# Altium PCB stabilizer_current_sense.PcbDoc (part 3 of 3)
Units mm, origin at the board's own origin, x right, y up, seen from the top; angles counter-clockwise.
Board outline 113.55 x 100 mm, 4 copper layers (Top, L2, L3, Bottom Layer), stack 1.579 mm thick; 206 components, 77 nets, 530 pads, 258 vias.
Unrouted connection lines stored in the file: 53.
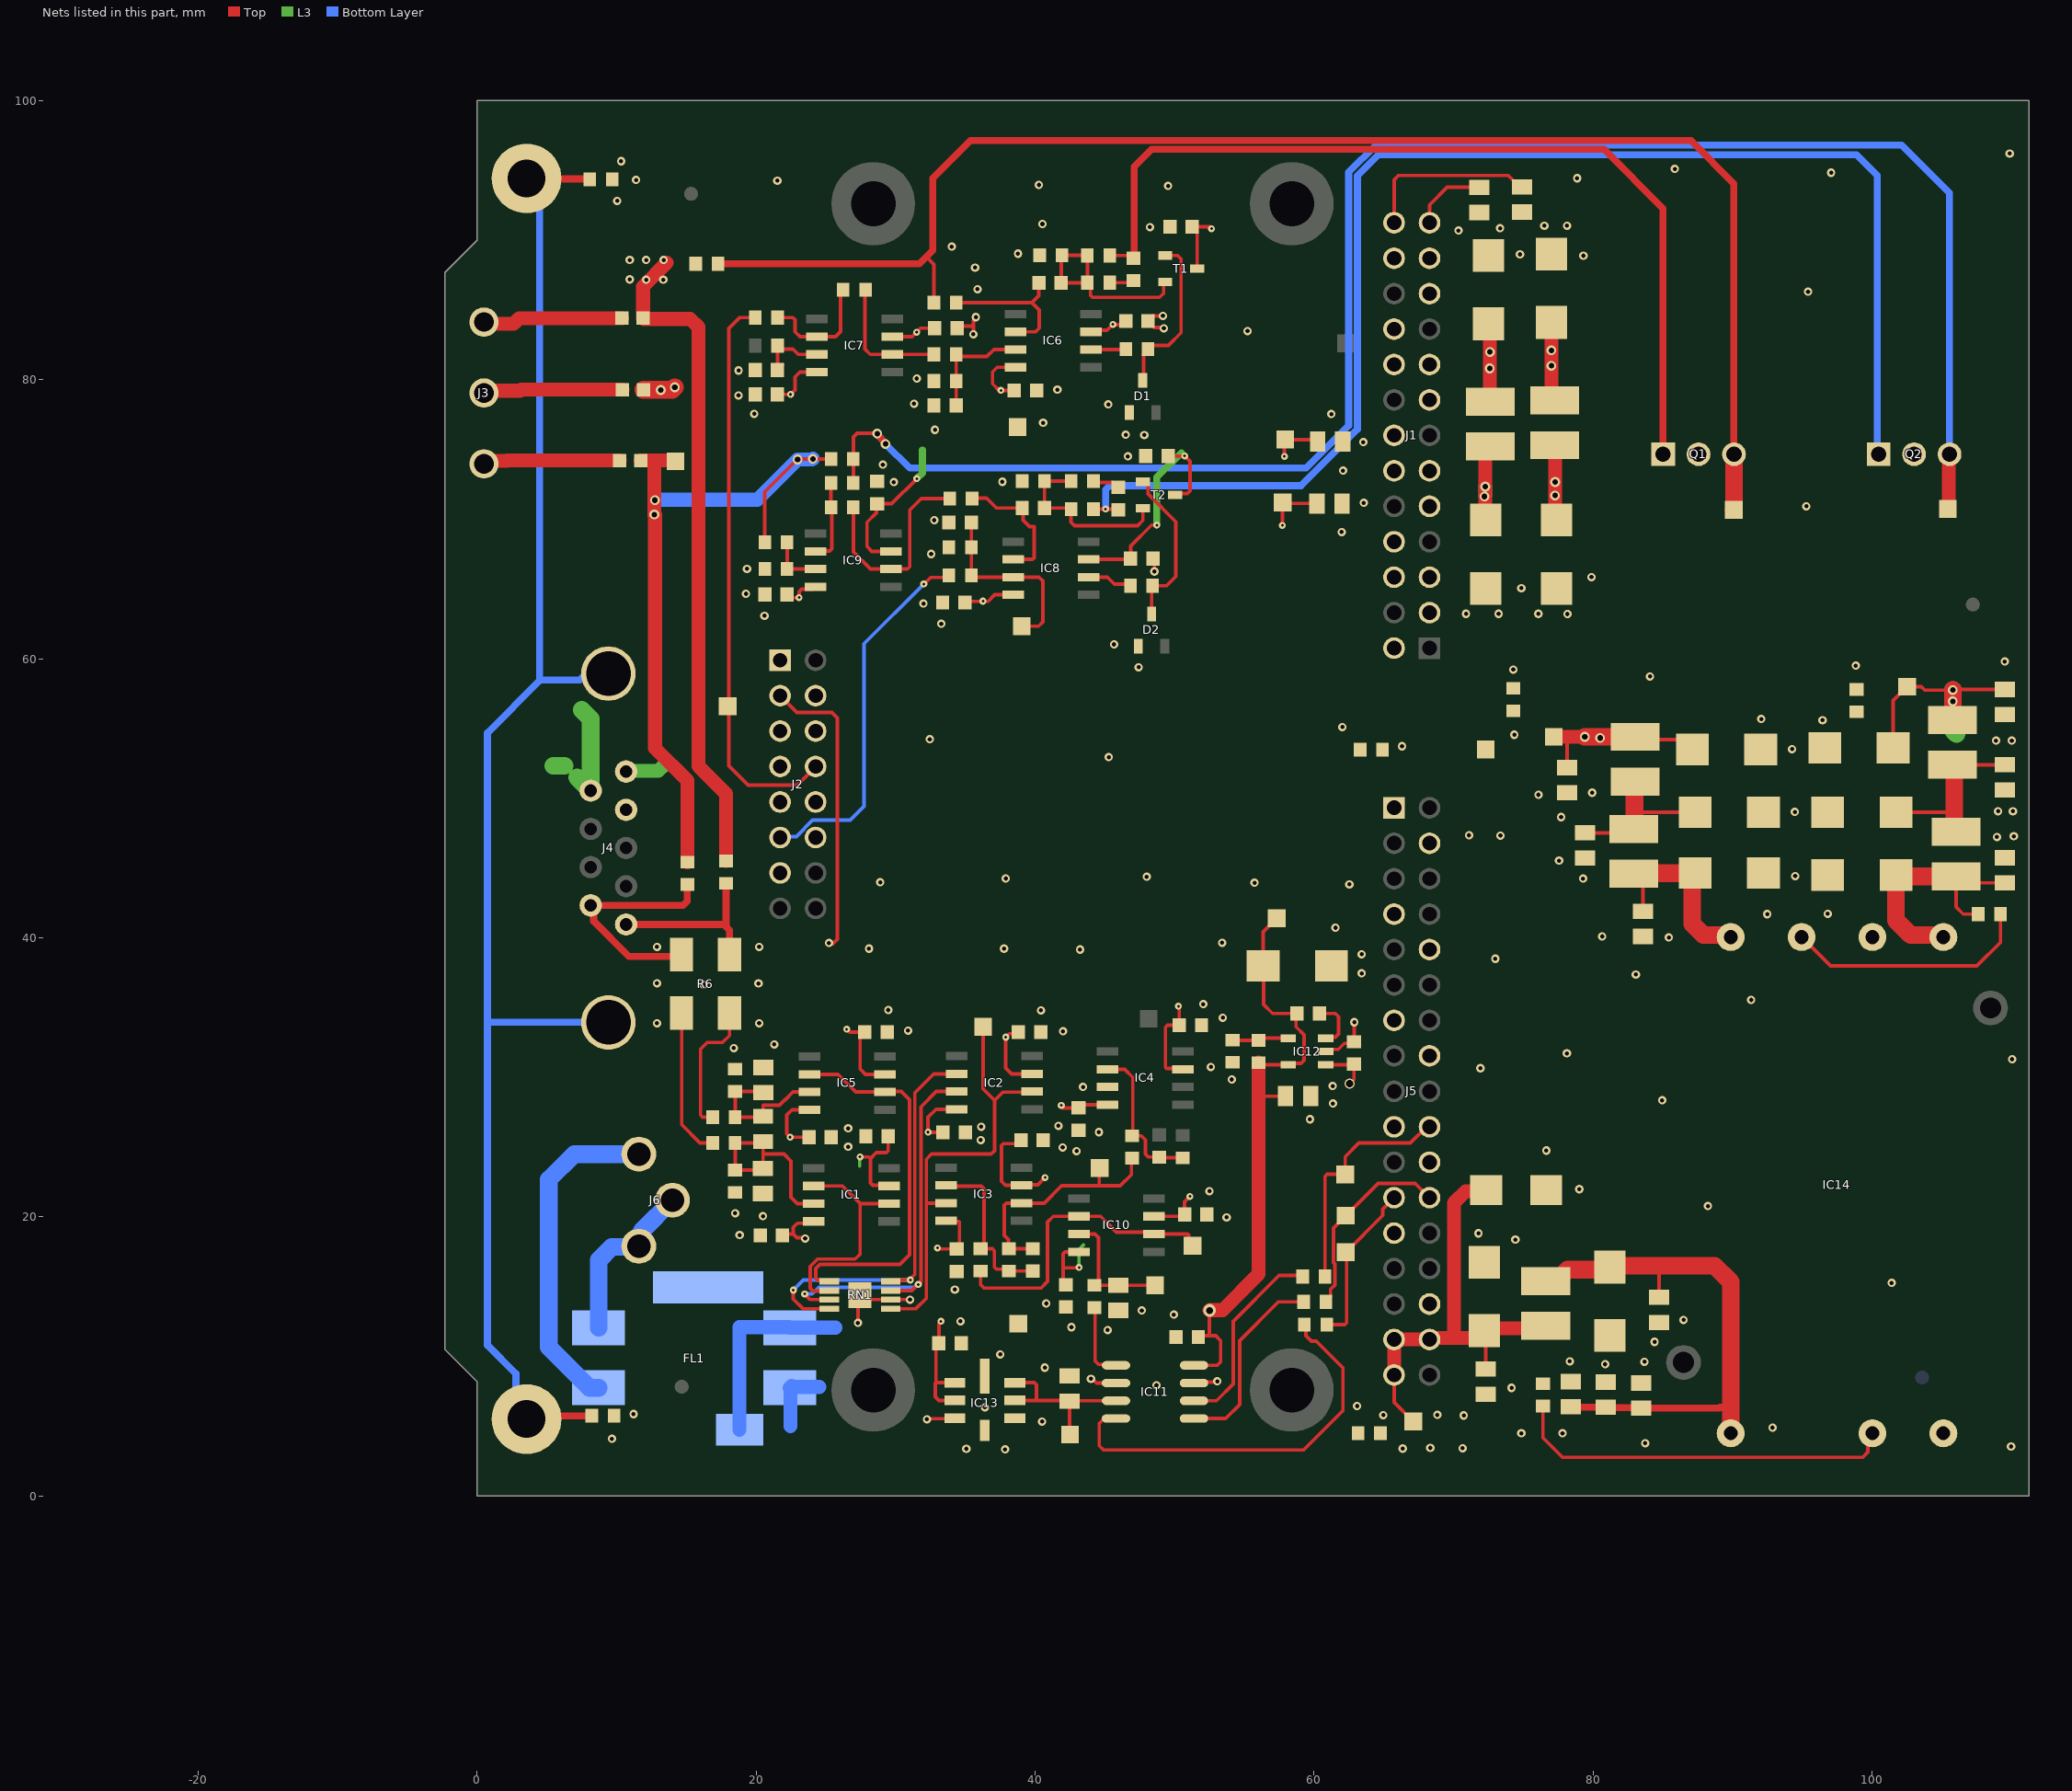
[diagram p4: the nets of this part, all layers, seen from the top]

## Via types
v1: diameter 0.6, hole 0.3, Top to Bottom Layer, tented both sides, 204 vias
v2: diameter 0.5, hole 0.2, Top to Bottom Layer, tented both sides, 32 vias
v3: diameter 0.7, hole 0.4, Top to Bottom Layer, tented both sides, 20 vias
v4: diameter 0.75, hole 0.5, Top to Bottom Layer, tented both sides, 1 vias
v5: diameter 0.9, hole 0.5, Top to Bottom Layer, tented both sides, 1 vias

## Nets (pads, with @x,y where several pads share a name; then routed paths per layer and width w, separated by ;. In a path a pad name is that pad's centre, name@x,y a point inside that pad or via, vN(x,y) a via of type N, cw(c..) or ccw(c..) an arc to the next point about the centre after c; other vN are vias at no path point) (continued)
COIL_COMMON: C3.1 C5.1 C6.1 C7.1 C8.1 C9.1 C10.1 C11.1 C12.1 C13.1 C14.1 C15.1 C16.1 C17.1 C19.1 C21.1 C23.1 C25.1 C26.1 C27.1 C28.1 C29.1 C30.1 C31.1 C32.1 C33.1 C34.2 C35.1 C36.1 C38.1 C39.2 C40.1 C41.2 C42.1 C43.2 C44.1 C45.1 C46.1 C47.1 C48.1 C49.1 C50.1 D1.1 D2.1 F1.1 IC4.3 IC11.2 IC11.7 IC12.2 IC13.3 IC13.4 IC13.5 IC13.8 J1.2 J1.3 J1.5 J1.6 J1.8 J1.9 J1.11 J1.12 J1.14 J1.15 J1.17 J1.18 J1.20 J1.21 J1.23 J1.24 J2.1 J2.3 J2.4 J2.5 J2.6 J2.7 J2.9 J2.10 J2.12 J2.13 R5.1 R9.1 R16.1 R18.1 R20.1 R25.1 R26.1 R32.1 R34.1 R40.1 R43.1 R44.1 R47.1 R48.1 R49.1 R50.1 RN1.6 RN1.9 TP13.1 TP14.1 | length 90.9
  Top w0.254: J2.3@21.73,57.35 22.93,56.15 25.425,56.15 25.825,55.75 25.825,39.905 v1@25.5,39.58 ; v1(27.3,12.406) 27.3,14.185 v1(27.506,14.391) 27.506,14.361 27.5,14.355 27.78,14.075 RN1.6@29.655,14.075 v1(31.036,14.075) ; C28.1@28.681,72.7 C28.1@28.95,72.969 ; v1(32.25,5.5) 32.292,5.542 34.208,5.542 IC13.3@34.25,5.583 ; C25.1@34.4,83.687 34.538,83.825 35.575,83.825 ; v1(35.575,83.25) 35.575,83.825 ; v1(35.75,84.475) 35.75,84.381 35.575,84.206 35.575,83.825 ; C9.1@40.584,25.502 C9.1@40.669,25.587 ; v1(42.001,33.302) v1@42.051,33.352 ; v1(44,8.4) 44.094,8.4 44.397,8.097 IC11.2@45.8,8.097 ; C27.1@48.43,67.195 C27.1@48.45,67.175 48.55,67.075 v1(48.55,66.25) ; v1(49.16,84.56) 48.448,84.56 48.1,84.212 C26.1@48.1,84.187 48.1,84.162 48.448,83.814 48.473,83.814 48.546,83.741 49.159,83.741 v1(49.225,83.675) ; IC11.7@51.388,8.097 51.452,8.161 52.991,8.161 v1(53.054,8.224) ; IC12.2@60.832,31.857 60.98,32.005 61.73,32.005 62.16,32.435 62.735,32.435 C42.1@62.85,32.55 62.875,32.575 v1(62.875,33.95)
  Top w1: 13.6,88.375 11.9,86.675 F1.1@11.9,84.4 11.958,84.342 15.289,84.342 15.875,83.757 15.875,52.302 17.85,50.327 R34.1@17.85,45.5
  other v1: 37.85,3.35 35.075,3.384 9.675,4.1 40.5,5.337 11.225,5.875 36.4,6.362 63.08,6.45 48.7,7.946 40.7,9.2 37.5,10.15 45.2,11.9 42.602,12.1 34.65,12.525 49.95,13.001 47.645,13.3 40.8,13.8 34.25,14.8 18.825,18.7 53.725,19.966 20.5,20.048 18.5,20.261 52.5,21.85 42.973,24.721 41.975,24.975 26.6,25.025 36.1,25.502 44.573,26.079 26.6,26.345 36.139,26.46 41.675,26.525 59.7,27 61.35,28.125 43.43,29.316 61.325,29.375 54.1,29.85 52.6,30.75 18.4,32.1 21.303,32.361 30.9,33.352 12.9,33.875 20.225,33.875 53.45,34.275 40.425,34.8 29.475,34.825 52.05,35.25 16.25,36.65 20.173,36.725 12.9,36.75 63.4,37.45 63.4,38.825 43.225,39.16 28.093,39.225 37.775,39.225 12.9,39.35 20.225,39.35 25.228,39.625 53.4,39.65 61.525,40.725 62.525,43.825 55.725,43.95 28.9,43.975 37.9,44.25 48,44.375 45.275,52.95 32.45,54.225 62.025,55.1 84.075,58.725 74.275,59.225 47.425,59.391 98.825,59.5 109.5,59.8 45.663,61.025 33.275,62.5 20.604,63.075 78.16,63.2 70.882,63.22 73.22,63.22 76.07,63.22 32,63.95 19.275,64.65 74.85,65.06 79.875,65.85 19.35,66.434 32.55,67.5 61.975,69.075 32.775,69.925 95.275,70.925 63.55,71.175 29.875,72.65 37.65,72.675 62.075,73.479 29.09,73.9 46.65,74.5 63.525,75.525 47.825,76.025 46.5,76.05 32.825,76.4 40.575,76.9 61.225,77.53 19.875,77.55 45.25,78.225 31.325,78.275 18.74,78.86 41.6,79.275 31.525,80.075 18.75,80.65 55.225,83.475 95.4,86.3 35.875,86.481 12.125,87.15 13.35,87.15 10.95,87.175 35.7,88.025 10.95,88.575 12.125,88.575 13.375,88.575 79.3,88.875 74.75,88.975 38.775,89.025 34.025,89.525 70.35,90.675 73.325,90.85 48.225,90.925 76.5,91.019 78.123,91.019 40.525,91.15 10.05,92.8 49.525,93.875 40.275,93.95 21.525,94.25 11.4,94.3 78.85,94.425 97.05,94.825 85.85,95.1 10.325,95.65 109.85,96.2
COIL_HIGH: F2.1 Q1.2 Q2.2 | length 2.3
  Top w1.27: F2.1@11.925,79.275 14,79.275 v3(14.175,79.45)
  other v3: 13.17,79.25
COIL_LOW: F3.1 R30.1 R31.2 R33.1 TP10.1 | length 55.3
  Top w0.254: R31.2@20.626,68.348 20.626,71.951 22.972,74.298 24.048,74.298 v3(24.07,74.32) ; v3@24.07,74.3 R30.1@25.376,74.3
  Top w1: F3.1@11.725,74.2 12.89,74.2 ; v3(12.71,70.33) 12.71,74.02 12.89,74.2 ; v3@12.76,70.33 12.76,53.579 15.075,51.264 R33.1@15.075,45.426 ; TP10.1@14.225,74.15 14.175,74.2 12.89,74.2
  Bottom Layer w1: v3(12.71,70.33) 12.71,71.34 12.76,71.39 20.09,71.39 v3(22.975,74.275) 24.025,74.275 v3(24.07,74.32)
  other v3: 12.75,71.36
DAC0_P: J2.8 R11.1 TP5.1 | length 40.9
  Top w0.254: R11.1@19.94,84.437 18.812,84.437 18.046,83.671 18.046,52.329 19.425,50.95 22.95,50.95 J2.8@24.27,52.27
DAC1_P: J2.11 R22.1 | length 26.7
  Top w0.254: v2(32.025,65.35) 32.025,65.325 32.525,65.825 33.68,65.825 R22.1@33.83,65.975
  Bottom Layer w0.254: J2.11@21.73,47.19 21.801,47.261 22.886,47.261 24.056,48.431 26.756,48.431 27.75,49.425 27.75,61.075 v2(32.025,65.35)
FP_GND: J4.10 J4.11 R43.2 R44.2 ST2.0 ST2.1 | length 113.5
  Top w0.5: ST2.0@2.788,6.28 ST2.0@3.556,5.512 ; ST2.1@3.556,94.412 3.587,94.381 8.055,94.381 R44.2@8.086,94.35 ; ST2.0@3.794,5.75 R43.2@8.225,5.75
  Top w1: ST2.0@3.556,5.512 ST2.0@3.794,5.75
  Bottom Layer w0.5: ST2.0@2.788,6.28 2.788,8.762 0.75,10.8 0.75,33.905 ; ST2.1@3.556,94.412 4.5,93.468 4.5,58.473 ; J4.11@7.823,58.93 7.366,58.473 4.5,58.473 ; J4.10@9.42,33.94 0.785,33.94 0.75,33.905 ; 0.75,33.905 0.75,54.675 4.5,58.425 4.5,58.473
FRONTEND_OFFSET: IC10.2 IC10.6 R1.1 TP11.1 | length 22.1
  Top w0.254: R1.1@36.094,16.122 36.094,15.14 36.334,14.9 40.42,14.9 40.891,15.371 40.891,19.634 41.299,20.042 IC10.2@43.134,20.042 44.699,20.042 45.834,18.907 48.399,18.907 IC10.6@48.534,18.772 50.928,18.772 51,18.7 51,17.937 TP11.1@51.1,17.837 ; TP11.1@51.281,17.947 TP11.1@51.287,17.941
GND1: C51.1 C52.2 C53.1 C54.2 C55.1 C56.2 C57.1 C58.2 C59.2 C60.1 C61.1 C62.1 C63.1 C64.1 C65.1 C66.1 C67.1 C68.1 C69.1 D3.2 FL1.4 IC14.3 IC14.5 J4.4 J5.1 J5.4 J5.7 J5.10 J5.13 J5.16 J5.19 J5.22 J5.25 J5.30 R41.1 R47.2 R48.2 R49.2 R50.2 TP15.1 | length 14.6
  L3 w1: J4.4@10.69,49.013 J4.4@10.69,49.175
  Bottom Layer w1: J4.4@10.69,49.175 J4.4@10.69,49.337 ; FL1.4@18.817,4.756 18.817,12.097 22.376,12.097 FL1.4@22.417,12.056 22.431,12.07 25.7,12.07
  other v1: 66.35,3.4 70.637,3.425 68.325,3.45 109.95,3.55 83.725,3.792 74.85,4.5 77.8,4.5 92.85,4.9 70.725,5.775 64.95,5.803 68.825,5.821 74.15,7.75 80.857,9.45 83.675,9.625 78.325,9.65 84.4,11.05 86.475,12.625 101.391,15.275 74.425,18.375 71.775,18.825 88.225,20.775 79,21.99 76.64,24.76 84.95,28.36 71.92,30.66 110.025,31.3 78.11,31.72 91.325,35.55 83.055,37.375 72.98,38.5 85.425,40.025 80.643,40.1 92.478,41.7 96.812,41.725 79.275,44.24 94.475,44.427 77.55,45.525 108.937,47.222 110.15,47.275 73.35,47.325 71.104,47.35 77.7,48.65 94.45,49.018 109.014,49.075 110.082,49.075 76.075,50.25 79.925,50.4 94.25,53.525 66.3,53.725 108.875,54.137 110,54.137 74.35,54.55 96.437,55.6 92.05,55.675
N12V0A: C11.2 C12.2 C13.2 C14.2 C15.2 C29.2 C30.2 C31.2 C32.2 C34.1 C49.2 C50.2 IC1.4 IC2.4 IC3.4 IC4.4 IC5.4 IC6.4 IC7.4 IC8.4 IC9.4 IC10.4 L2.2 TP22.1 | length 53
  Top w0.254: C29.2@21.54,78.937 v2(22.48,78.937) 22.8,79.257 22.8,80.187 23.145,80.532 IC7.4@24.35,80.532 ; C11.2@22.18,18.395 C11.2@21.9,18.675 22.002,18.777 22.675,18.777 ; C32.2@22.226,64.598 22.45,64.373 v2(23.082,64.373) 23.082,64.795 23.266,64.98 24.103,64.98 IC9.4@24.276,65.153 ; v1@23.508,18.45 v1(23.521,18.45) 23.455,18.516 22.935,18.516 22.675,18.777 ; C12.2@23.792,25.714 v2(22.438,25.714) 22.204,25.948 22.204,27.301 22.584,27.682 IC5.4@23.843,27.682 ; IC1.4@24.128,19.682 23.993,19.547 22.972,19.547 22.675,19.25 22.675,18.777 ; v2(33.004,17.774) 33.078,17.7 C14.2@34.379,17.7 C14.2@34.401,17.722 ; C13.2@33.251,26.199 C13.2@33.4,26.05 32.35,26.05 v2(32.325,26.075) 32.325,27.142 32.896,27.712 IC2.4@34.379,27.712 ; IC3.4@33.629,19.722 33.669,19.682 34.518,19.682 34.573,19.627 34.573,17.834 34.685,17.722 C14.2@34.401,17.722 ; C14.2@34.453,17.626 34.401,17.678 C14.2@34.401,17.722 ; C14.2@34.453,17.874 34.453,17.774 C14.2@34.401,17.722 ; C31.2@35.43,64.105 v2@36.275,64.105 ; v2(36.261,64.125) 36.261,64.119 v2@36.275,64.105 ; IC8.4@38.43,64.575 37.1,64.575 36.63,64.105 v2@36.275,64.105 ; C30.2@38.508,79.225 v2(37.55,79.225) 37.425,79.225 36.95,79.7 36.95,80.55 37.282,80.882 IC6.4@38.6,80.882 IC6.4@38.508,80.79 ; v2(41.875,28) 41.85,27.975 42.013,27.812 C15.2@43.113,27.812 43.347,28.046 IC4.4@45.191,28.046 ; C34.1@42.2,15.143 42,15.343 42,16.35 ; IC10.4@43.134,17.502 42.15,17.502 42,17.352 42,16.35 ; v2(43.15,16.375) 43.125,16.35 42,16.35 ; v2(57.725,69.55) 57.725,71.35 TP22.1@57.75,71.375 ; TP22.1@57.75,71.2 57.825,71.125 C49.2@60.2,71.125
  Top w1: C50.2@72.26,71.06 v3(72.26,72.33) 72.26,75.19 72.39,75.32 72.32,75.39 72.34,75.41 72.275,75.475 L2.2@72.4,75.6 ; C50.2@72.275,70.775 72.34,70.84 C50.2@72.32,70.86
  L3 w0.254: v2(43.15,16.375) 43.15,17.675 43.45,17.975
  L3 w1: v3@72.26,71.62 v3(72.26,72.33)
  other v3: 72.21,71.62
N12V0AS: C47.2 C48.2 J1.26 L2.1 | length 18.6
  Top w0.254: J1.26@65.73,91.24 65.73,94.32 66.035,94.625 73.9,94.625 74.725,93.8 C47.2@74.9,93.8 ; C48.2@72.5,84 C48.2@72.6,84.1
  Top w1: C48.2@72.6,84.1 72.639,84.061 72.6,84.022 v3(72.6,81.979) 72.6,78.452 L2.1@72.639,78.413
  other v3: 72.58,80.8
N15V0: C68.2 C69.2 J4.5 L7.2 TP25.1 | length 20.3
  Top w0.254: C69.2@101.5,53.6 101.5,57 TP25.1@102.5,58 103.516,58 103.766,57.75 v3(105.775,57.75) ; v3@105.825,57.8 C68.2@109.5,57.8
  Top w1.27: L7.2@105.75,55.6 105.775,55.625 v3(105.775,56.94) v3(105.775,57.75)
  L3 w1: J4.5@10.633,51.972 J4.5@10.69,51.915 10.74,51.965 12.99,51.965 13.425,52.4
  L3 w1.27: v3(105.775,57.75) 105.775,54.865 106.04,54.6
NetC1_1: C1.1 IC3.2 R1.2 R2.1 | length 11.5
  Top w0.254: IC3.2@34.384,22.197 36.139,22.197 36.334,22.002 36.334,18.045 36.091,17.802 R1.2@36.014,17.802 ; R1.2@36.094,17.722 36.935,17.722 37.084,17.573 37.084,16.401 37.233,16.252 37.994,16.252 R2.1@38.124,16.122 C1.1@39.834,16.122
NetC1_2: C1.2 IC3.6 R2.2 R7.1 TP3.1 | length 17.6
  Top w0.254: R2.2@38.004,17.722 R2.2@38.084,17.802 ; C1.2@39.834,17.722 R2.2@38.124,17.722 38.084,17.762 R2.2@38.084,17.802 ; TP3.1@44.637,23.5 44.6,23.463 44.6,22.239 ; R7.1@46.943,24.212 46.9,24.169 46.9,23.037 46.102,22.239 44.6,22.239 ; R2.2@38.084,17.802 38.084,18.388 37.8,18.672 37.8,20.843 37.949,20.992 IC3.6@39.029,20.992 40.651,20.992 41.898,22.239 44.6,22.239
NetC2_1: C2.1 IC4.2 R3.1 R7.2 | length 11.2
  Top w0.254: IC4.2@45.191,30.586 46.414,30.586 47,30 47,25.869 R7.2@46.943,25.812 47.6,25.812 47.9,25.512 47.9,24.5 48.1,24.3 C2.1@48.833,24.3 ; C2.1@48.9,24.279 48.879,24.3 C2.1@48.833,24.3 ; R3.1@50.581,24.241 48.892,24.241 C2.1@48.833,24.3
NetC3_2: C3.2 C4.2 IC1.3 R4.2 R5.2 | length 14.6
  Top w0.254: IC1.3@24.128,20.952 22.955,20.952 22.5,21.407 22.5,24.001 22,24.501 20.5,24.501 ; 20.5,24.501 C4.2@20.5,25.402 20.399,25.301 R4.2@18.5,25.301 R5.2@18.5,23.36 20.379,23.36 C3.2@20.5,23.481 20.5,24.501
NetC4_1: C4.1 C5.2 IC5.3 R8.2 R9.2 | length 10.5
  Top w0.254: C5.2@20.519,28.901 20.5,28.882 20.391,28.991 R9.2@18.5,28.991 R8.2@18.5,27.15 20.448,27.15 C4.1@20.5,27.202 20.5,28.001 21.679,28.001 22.079,28.401 22.1,28.401 22.651,28.952 IC5.3@23.843,28.952
NetC17_2: C17.2 IC6.3 R13.2 R16.2 | length 7.9
  Top w0.254: C17.2@34.35,78.142 R16.2@34.35,79.892 34.35,81.5 34.501,81.651 36.55,81.651 37.051,82.152 IC6.3@38.6,82.152
NetC18_1: C18.1 R17.2 | length 2.3
  Top w0.254: R17.2@45.35,86.948 46.905,86.948 C18.1@47.05,87.092 C18.1@46.702,87.44
NetC18_2: C18.2 Q1.1 R14.2 | length 66
  Top w0.254: R14.2@45.495,89.037 R14.2@45.35,88.892 C18.2@46.85,88.892
  Top w0.5: C18.2@46.85,88.892 47.075,88.892 47.1,88.917 47.1,95.25 48.346,96.496 80.773,96.496 85.01,92.259 Q1.1@85.01,74.775
NetC19_2: C19.2 IC7.3 R15.2 | length 5.3
  Top w0.254: C19.2@21.54,80.687 C19.2@21.54,80.712 ; C19.2@21.913,81.06 21.888,81.06 C19.2@21.54,80.712 ; IC7.3@24.35,81.802 23.036,81.802 22.651,82.187 21.79,82.187 R15.2@21.54,82.437 C19.2@21.54,80.712
NetC20_1: C20.1 IC6.2 R19.1 | length 11.4
  Top w0.254: R19.1@34.673,85.835 R19.1@34.35,85.512 39.768,85.512 ; IC6.2@38.6,83.422 40.035,83.422 40.3,83.687 40.3,84.98 39.768,85.512 ; C20.1@40.27,86.925 40.27,86.015 39.768,85.512
NetC20_2: C20.2 R14.1 R17.1 R18.2 T1.2 | length 14.9
  Top w0.254: T1.2@49.315,86.992 49.215,86.892 49.215,86.192 48.915,85.892 44.121,85.892 43.972,86.041 43.972,86.725 R17.1@43.75,86.948 ; R17.1@43.75,86.948 43.727,86.925 C20.2@41.87,86.925 41.87,88.845 R18.2@41.925,88.9 43.742,88.9 R14.1@43.75,88.892 R17.1@43.75,86.948
NetC22_1: C22.1 R24.2 | length 2
  Top w0.254: R24.2@44.18,72.725 44.282,72.623 45.613,72.623 C22.1@45.961,72.275
NetC22_2: C22.2 Q2.1 R23.2 | length 99.9
  Top w0.254: R23.2@44.18,70.725 v2(45.05,70.725) 45.911,70.725 C22.2@45.961,70.675
  Bottom Layer w0.5: v2(45.05,70.725) 45.05,72.105 45.343,72.398 59.06,72.398 63.1,76.438 63.1,94.588 64.612,96.1 98.875,96.1 100.35,94.625 100.35,75.31 Q2.1@101.01,74.65
NetC23_2: C23.2 IC8.3 R22.2 R25.2 TP8.1 | length 13.6
  Top w0.254: C23.2@35.43,69.765 R25.2@35.43,67.975 R22.2@35.43,65.975 35.56,65.845 IC8.3@38.43,65.845 40.28,65.845 40.55,65.575 40.55,62.63 40.245,62.325 TP8.1@39.05,62.325
NetC24_1: C24.1 IC8.2 R28.1 | length 9.6
  Top w0.254: R28.1@35.48,71.475 35.505,71.5 36.525,71.5 37.225,70.8 C24.1@39.075,70.8 39.15,70.725 39.15,69.925 39.6,69.475 39.93,69.475 39.93,67.225 39.82,67.115 IC8.2@38.43,67.115
NetC24_2: C24.2 R23.1 R24.1 R26.2 T2.2 | length 13
  Top w0.254: R24.1@42.58,72.725 R26.2@40.68,72.725 40.675,72.72 C24.2@40.675,70.8 42.505,70.8 R23.1@42.58,70.725 42.58,69.774 42.829,69.525 47.345,69.525 47.73,69.91 T2.2@47.73,70.775
NetC37_1: C37.1 IC12.3 | length 4
  Top w0.254: C37.1@60.551,34.751 C37.1@60.375,34.575 61.525,34.575 61.75,34.35 61.75,33.1 61.525,32.875 60.9,32.875 IC12.3@60.832,32.807
NetC51_2: C51.2 C52.1 IC14.7 L3.1 | length 14.2
  Top w0.254: L3.1@82.9,44.6 83.573,43.927 C51.2@83.573,41.9
  Top w1.27: L3.1@82.9,44.6 82.925,44.625 C52.1@87.275,44.625 ; C52.1@87.3,44.65 C52.1@87.275,44.625 ; IC14.7@89.855,40.055 89.715,40.195 87.905,40.195 87.1,41 87.1,44.45 C52.1@87.275,44.625
NetC53_2: C53.2 C54.1 L3.2 L4.1 | length 11.6
  Top w0.254: C53.2@79.4,47.522 82.622,47.522 L3.2@82.9,47.8 ; 82.95,49.4 83.35,49 C54.1@87.3,49
  Top w1.27: L3.2@82.9,47.8 82.95,47.85 82.95,49.4 82.95,51.15 L4.1@83,51.2
NetC59_1: C59.1 C60.2 C61.2 C62.2 C63.2 IC14.1 L5.2 | length 38.4
  Top w0.254: C60.2@84.72,14.242 84.72,16.22 85,16.5
  Top w0.5: C63.2@78.4,6.4 78.419,6.381 80.881,6.381 C61.2@80.9,6.362 80.931,6.331 83.411,6.331 C62.2@83.442,6.3 89.037,6.3 89.087,6.349 89.855,6.349
  Top w1: IC14.1@89.7,4.313 IC14.1@89.852,4.161 ; IC14.1@89.853,4.498 IC14.1@89.855,4.495
  Top w1.27: L5.2@77.35,15.4 78.17,16.22 81.02,16.22 C59.1@81.2,16.4 81.3,16.5 85,16.5 88.7,16.5 89.855,15.345 89.855,6.349 IC14.1@89.855,4.495
NetC64_2: C64.2 C65.2 IC14.4 L6.1 R42.1 | length 19.2
  Top w0.254: C65.2@101.7,44.4 C65.2@101.8,44.4 ; L6.1@105.4,44.4 L6.1@106,44.4 ; R42.1@107.594,41.7 106.52,41.7 106,42.22 L6.1@106,44.4 ; C64.2@109.5,43.935 106.465,43.935 L6.1@106,44.4
  Top w1.27: C65.2@101.7,44.4 101.7,41.249 102.755,40.195 104.955,40.195 IC14.4@105.095,40.055 ; C65.2@101.7,44.5 101.8,44.4 L6.1@105.4,44.4
NetC66_2: C66.2 C67.2 L6.2 L7.1 | length 12.9
  Top w0.254: C67.2@101.7,49 105.625,49 105.875,49.25 ; L7.1@105.75,52.4 C66.2@109.5,52.4
  Top w1.27: L7.1@105.75,52.4 105.875,52.275 105.875,49.25 105.875,47.725 L6.2@106,47.6
NetD1_3: D1.3 R12.2 T1.1 | length 11.8
  Top w0.254: D1.3@47.715,79.942 47.777,80.004 47.777,81.864 R12.2@48.1,82.187 48.35,82.437 49.55,82.437 50.465,83.352 50.465,88.652 50.225,88.892 T1.1@49.315,88.892
NetD2_3: D2.3 R21.2 T2.1 | length 11.9
  Top w0.254: T2.1@47.73,72.675 47.93,72.675 48.103,72.502 48.103,71.802 50.095,69.81 50.095,65.89 49.43,65.225 R21.2@48.43,65.225 48.35,65.145 D2.3@48.35,63.2
NetF1_2: F1.2 J3.1 | length 10.1
  Top w1: J3.1@0.5,84.125 0.625,84 2.625,84 3.025,84.4 F1.2@10.4,84.4
NetF2_2: F2.2 J3.2 | length 10
  Top w1: J3.2@0.5,79.045 0.655,79.2 3.075,79.2 3.15,79.275 F2.2@10.425,79.275
NetF3_2: F3.2 J3.3 | length 9.8
  Top w1: J3.3@0.5,73.965 0.71,74.175 2.15,74.175 2.175,74.2 F3.2@10.225,74.2
NetFL1_1: FL1.1 J6.3 | length 24
  Bottom Layer w1.27: FL1.1@8.717,7.756 8.067,7.756 5.15,10.673 5.15,22.68 6.97,24.5 J6.3@11.6,24.5
NetFL1_3: FL1.3 J6.1 J6.2 | length 12.4
  Bottom Layer w1.27: FL1.3@8.717,12.056 8.717,16.905 9.66,17.848 11.548,17.848 J6.2@11.6,17.9 11.78,18.08 11.78,18.969 J6.1@14.011,21.2
NetIC1_2: IC1.2 IC1.6 RN1.2 | length 16.7
  Top w0.254: IC1.2@24.128,22.222 26.193,22.222 27.463,20.952 ; RN1.2@25.255,14.725 25.228,14.698 24.069,14.698 23.887,14.88 23.887,16.456 24.412,16.981 27.1,16.981 27.463,17.344 27.463,20.952 ; IC1.6@29.64,21.064 IC1.6@29.528,20.952 27.463,20.952
NetIC2_2: IC2.2 RN1.4 RN1.8 | length 30.4
  Top w0.254: v2(22.67,14.753) 22.67,14.11 23.355,13.425 RN1.4@25.255,13.425 ; RN1.8@29.655,15.375 29.76,15.48 v2(31.06,15.48) 31.06,15.56 31.381,15.881 31.381,28.898 32.735,30.252 IC2.2@34.041,30.252
  Bottom Layer w0.254: v2(22.67,14.753) 23.397,15.48 v2(31.06,15.48)
NetIC2_3: IC2.3 RN1.3 RN1.7 | length 28.3
  Top w0.254: v2(23.49,14.48) 23.895,14.075 RN1.3@25.255,14.075 ; RN1.7@29.425,14.725 RN1.7@29.434,14.716 ; RN1.7@29.655,14.725 31.173,14.725 31.608,15.16 v2(31.63,15.16) 31.821,15.351 31.821,27.886 32.917,28.982 IC2.3@34.379,28.982
  Bottom Layer w0.254: v2(23.49,14.48) 24.026,14.48 24.491,14.945 31.349,14.945 31.563,15.16 v2(31.63,15.16)
NetIC5_2: IC5.2 IC5.6 RN1.1 | length 28.1
  Top w0.254: IC5.2@23.843,30.222 25.873,30.222 27.143,28.952 IC5.6@29.243,28.952 29.282,28.991 30.399,28.991 31,28.39 31,17.302 30.298,16.6 24.57,16.6 24.27,16.3 24.27,15.834 24.268,15.832 24.268,15.622 24.417,15.473 25.157,15.473 RN1.1@25.255,15.375 ; RN1.1@25.702,15.473 RN1.1@25.8,15.375
NetIC6_6: IC6.6 R12.1 | length 2.5
  Top w0.254: IC6.6@44,82.152 46.465,82.152 R12.1@46.5,82.187
NetIC7_2: IC7.2 R10.1 R11.2 | length 9
  Top w0.254: R11.2@21.655,84.322 R11.2@21.54,84.437 22.651,84.437 22.8,84.289 22.8,83.422 23.15,83.072 IC7.2@24.35,83.072 25.685,83.072 26.05,83.437 26.05,86.237 R10.1@26.25,86.437
NetIC7_6: IC7.6 R10.2 R13.1 | length 9.4
  Top w0.254: R10.2@27.85,86.437 27.8,86.387 27.8,82.187 28.185,81.802 IC7.6@29.75,81.802 R13.1@32.75,81.802
NetIC8_6: IC8.6 R21.1 | length 3.3
  Top w0.254: IC8.6@43.83,65.845 45.19,65.845 45.68,65.355 46.7,65.355 R21.1@46.83,65.225
NetIC9_2: IC9.2 R27.2 R29.1 | length 6
  Top w0.254: IC9.2@24.276,67.693 24.302,67.719 25.277,67.719 25.432,67.873 25.432,70.792 R27.2@25.376,70.848 R29.1@25.376,72.598
NetIC9_3: IC9.3 R31.1 R32.2 | length 4
  Top w0.254: R31.1@22.226,68.348 R32.2@22.226,66.423 IC9.3@24.276,66.423
NetIC9_6: IC9.6 R27.1 R28.2 | length 15.4
  Top w0.254: R27.1@27.226,70.598 R27.1@26.976,70.848 26.975,67.65 28.202,66.423 IC9.6@29.676,66.423 30.857,66.423 31.015,66.58 31.015,70.645 31.845,71.475 R28.2@33.88,71.475
NetIC11_1: IC11.1 R35.1 | length 5.5
  Top w0.254: R35.1@44.243,13.498 44.3,13.441 44.3,9.69 44.555,9.435 45.732,9.435 IC11.1@45.8,9.367
NetIC11_4: IC11.4 R38.1 | length 29.9
  Top w0.254: IC11.4@46.505,5.557 IC11.4@45.8,5.557 44.955,5.557 44.6,5.202 44.6,3.6 44.9,3.3 59.251,3.3 62.063,6.112 62.063,9.187 60.15,11.1 59.8,11.1 59.4,11.5 59.4,12.175 R38.1@59.3,12.275
NetIC11_5: IC11.5 R37.2 | length 14.1
  Top w0.127: R37.2@59.403,14.054 R37.2@59.442,14.015
  Top w0.254: IC11.5@51.388,5.557 53.657,5.557 54.661,6.561 54.661,11.136 57.44,13.915 R37.2@59.25,13.915
NetIC11_6: IC11.6 R36.2 | length 14.4
  Top w0.254: IC11.6@51.388,6.827 52.997,6.827 54.2,8.03 54.2,12.521 57.479,15.8 R36.2@59.375,15.8 ; R36.2@59.317,15.875 R36.2@59.367,15.825
NetIC12_4: IC12.4 R39.1 R40.2 | length 4
  Top w0.254: R40.2@54.15,32.675 54.175,32.65 R39.1@56.025,32.65 ; R39.1@56.025,32.807 IC12.4@58.132,32.807
NetIC14_2: IC14.2 R41.2 | length 27.8
  Top w0.254: R41.2@76.4,6.45 76.4,4.175 77.8,2.775 99.315,2.775 99.689,3.149 99.689,4.169 IC14.2@100.015,4.495
NetIC14_6: IC14.6 R42.2 | length 17.8
  Top w0.254: IC14.6@94.935,40.055 97.01,37.98 107.5,37.98 109.194,39.674 R42.2@109.194,41.7
NetQ1_3: Q1.3 R19.2 R20.2 TP7.1 | length 107.8
  Top w0.254: 32.211,88.792 32.75,88.252 R19.2@32.75,85.512 R19.2@32.675,85.587
  Top w0.5: R20.2@17.275,88.3 31.719,88.3 32.211,88.792 32.675,89.256 32.675,94.425 35.373,97.123 87.002,97.123 90.09,94.035 Q1.3@90.09,74.775
  Top w1.27: TP7.1@90.075,70.675 90.09,70.69 Q1.3@90.09,74.775
NetQ2_3: Q2.3 R29.2 R30.2 TP9.1 | length 128.7
  Top w0.254: R29.2@26.976,72.598 R30.2@26.976,74.3 26.976,75.884 27.246,76.155 28.665,76.155 v3(28.69,76.13)
  Top w0.5: v3(28.69,76.13) 28.728,76.092 28.728,75.996 29.28,75.444 v3(29.28,75.39)
  Top w1: Q2.3@105.4,74.51 105.483,74.428 105.483,70.783 TP9.1@105.425,70.725
  Top w1.27: Q2.3@105.4,74.51 Q2.3@105.54,74.65
  Bottom Layer w0.5: v3(28.69,76.13) 28.728,76.092 28.728,75.996 29.28,75.444 v3(29.28,75.39) ; v3@29.281,75.391 31.021,73.652 59.427,73.652 62.473,76.698 62.473,94.848 64.425,96.8 102.105,96.8 105.54,93.365 105.54,75.2 Q2.3@106.09,74.65
NetR4_1: R4.1 R6.E2 | length 10.9
  Top w0.254: R6.E2@14.67,34.6 14.67,26.609 15.978,25.301 R4.1@16.9,25.301 ; R6.E2@15.1,34.73 R6.E2@15.17,34.8
NetR6_E1: R6.E1 R8.1 | length 9.7
  Top w0.254: R8.1@16.9,27.15 16.174,27.15 16.025,27.299 16.025,32.025 16.5,32.5 17.6,32.5 18.1,33 R6.E1@18.1,34.6
P5V0: C36.2 C37.2 C43.1 C44.2 C45.2 IC11.8 IC12.5 IC13.1 IC13.2 R39.2 TP20.1 | length 54.9
  Top w0.254: v2(33.25,12.525) 33.105,12.38 C45.2@33.105,10.95 32.9,10.745 32.9,8.123 ; IC13.2@34.25,6.853 33.105,6.853 32.855,7.103 32.855,8.078 32.9,8.123 ; IC13.1@34.25,8.123 32.9,8.123 ; IC11.8@51.388,9.367 53.054,9.367 53.3,9.613 53.3,11.141 52.941,11.5 52.5,11.5 ; C36.2@51.7,11.4 51.8,11.5 52.5,11.5 ; v5(52.5,13.3) 52.5,11.5 ; 56.025,28.75 56.125,28.65 C44.2@57.95,28.65 C44.2@58.175,28.425 ; R39.2@56.025,30.907 IC12.5@58.132,30.907 58.239,31.013 59.063,31.013 59.275,31.225 59.275,33.05 58.7,33.625 58.7,34.5 C37.2@58.775,34.575 57.025,34.575 56.375,35.225 56.375,37.975 C43.1@56.35,38 56.35,40.427 TP20.1@57.325,41.402 TP20.1@57.833,40.894
  Top w0.508: C43.1@55.813,38.613 C43.1@55.9,38.7 ; R39.2@56.025,30.854 56.071,30.9 R39.2@56.175,30.9
  Top w1: v5(52.5,13.3) 52.525,13.325 53.45,13.325 56.025,15.9 56.025,28.75 56.025,30.854 56.025,30.907 R39.2@56.025,31.05
P12V0A: C6.2 C7.2 C8.2 C9.2 C10.2 C16.2 C21.2 C25.2 C26.2 C27.2 C28.2 C35.2 C40.2 C41.1 C42.2 IC1.7 IC2.7 IC3.7 IC4.7 IC5.7 IC6.7 IC7.7 IC8.7 IC9.7 IC10.7 IC12.1 L1.2 T1.3 T2.3 TP19.1 | length 87.4
  Top w0.254: v2(26.5,33.45) 26.704,33.246 C7.2@27.8,33.246 27.463,32.909 27.463,30.587 27.828,30.222 IC5.7@29.243,30.222 ; v2(27.455,24.3) 28.087,24.3 28.2,24.187 ; C6.2@29.469,25.779 29.469,24.749 29.321,24.6 28.613,24.6 28.2,24.187 ; IC1.7@29.528,22.222 29.485,22.265 28.372,22.265 28.2,22.437 28.2,24.187 ; IC9.7@29.676,67.693 28.296,67.693 27.954,68.035 27.954,69.773 28.625,70.444 28.625,71.044 C28.2@28.681,71.1 29.725,71.1 v2(31.525,72.9) ; IC7.7@29.75,83.072 31.185,83.072 v2(31.513,83.4) 31.8,83.687 C25.2@32.8,83.687 ; C8.2@38.8,33.246 38.685,33.131 38.152,33.131 v2(37.9,32.88) 37.9,30.667 38.315,30.252 IC2.7@39.779,30.252 ; C9.2@38.984,25.502 38.734,25.252 37.733,25.252 37.584,25.103 37.584,22.551 37.873,22.262 IC3.7@39.029,22.262 39.066,22.299 40.185,22.299 v2(40.711,22.825) ; IC8.7@43.83,67.115 C27.2@46.83,67.115 ; IC6.7@44,83.422 44.121,83.543 45.156,83.543 45.55,83.937 v2@45.562,83.937 ; v2(45.575,83.95) v2@45.562,83.937 ; C26.2@46.5,84.187 46.25,83.937 v2@45.562,83.937 ; C27.2@46.85,67.175 46.85,68.075 48.35,69.575 v2(48.725,69.575) ; IC10.7@48.534,20.042 50.579,20.042 C35.2@50.714,20.177 50.714,21.089 v2(51.1,21.475) ; C21.2@49.53,74.525 v2(50.725,74.525) 51.1,74.15 51.1,72.025 50.911,71.836 50.141,71.836 T2.3@50.03,71.725 ; v2(50.275,35.101) 50.331,35.045 C10.2@50.331,33.735 49.495,33.735 49.346,33.586 49.346,30.718 49.435,30.629 50.548,30.629 IC4.7@50.591,30.586 ; T1.3@51.615,87.942 51.613,87.944 51.613,90.594 C16.2@51.265,90.942 52.523,90.942 v2(52.65,90.815) ; v2(57.869,74.5) 57.869,75.644 TP19.1@57.925,75.7 60.1,75.7 C40.2@60.25,75.55 ; IC12.1@60.832,30.907 62.807,30.907 C42.2@62.85,30.95 62.85,29.859 v4(62.541,29.55)
  Top w1: L1.2@77.23,75.3 77.27,75.26 77.27,70.78 C41.1@77.325,70.725
  L3 w0.254: 27.425,23.65 27.425,24.27 v2(27.455,24.3)
  L3 w0.5: v2(31.525,72.9) 31.925,73.3 31.925,74.95 ; v2(48.725,69.575) 48.725,73 50.488,74.763
  other v3: 77.26,71.7 77.27,72.66
P12V0AS: C38.2 C39.1 J1.25 L1.1 | length 11.2
  Top w0.254: J1.25@68.27,91.24 68.27,92.514 69.531,93.775 71.65,93.775 C38.2@71.227,94.198
  Top w1: C39.1@77,84.1 v3(77,82.09) 77,79.1 L1.1@77.3,78.8
  other v3: 77,80.99
P12V0S: C57.2 C58.1 D3.1 FL1.2 J5.31 J5.32 J5.33 L5.1 TP24.1 | length 38.5
  Top w0.254: J5.33@65.73,8.68 65.73,6.716 TP24.1@67.1,5.346 ; J5.31@65.73,10.9 J5.31@65.73,11.22 ; C58.1@72.2,11.858 72.3,11.758 C57.2@72.3,9.1 ; C57.2@72.325,9.12 C57.2@72.352,9.093
  Top w1: J5.33@65.73,8.68 J5.31@65.73,10.9 ; J5.31@65.73,11.22 J5.32@68.27,11.22 68.375,11.325 70.025,11.325 ; D3.1@72.33,21.93 72.24,21.84 70.86,21.84 70.025,21.005 70.025,11.325 ; L5.1@77.1,12.2 L5.1@76.6,12.2 76.325,12.2 76.1,11.975 76.046,12.029 72.371,12.029 C58.1@72.2,11.858 71.667,11.325 70.025,11.325
  L3 w1.27: J5.32@68.27,11.22 J5.32@68.27,11.296
  Bottom Layer w1: FL1.2@22.417,7.756 FL1.2@22.47,7.703 ; 22.47,5.006 FL1.2@22.47,7.703 ; 24.52,7.82 22.607,7.82 22.544,7.883 22.47,7.809 FL1.2@22.47,7.703
P15V0: C55.2 C56.1 J4.9 L4.2 TP23.1 | length 21
  Top w0.254: C55.2@78.123,52.2 78.123,54.223 78.3,54.4 ; L4.2@83,54.4 83.2,54.2 86.4,54.2 C56.1@87.1,53.5
  Top w1: TP23.1@77.045,54.4 TP23.1@77.171,54.4 78.3,54.4 v3(79.4,54.4)
  Top w1.27: J4.9@8.061,50.545 J4.9@8.15,50.545 ; v3(79.4,54.4) L4.2@83,54.4
  L3 w1.27: 5.475,52.325 6.281,52.325 ; 7.175,51.5 8.13,50.545 J4.9@8.15,50.545 8.15,55.688 7.5,56.338
  other v3: 80.49,54.32
REF_2V5: C46.2 IC11.3 IC13.6 IC13.7 TP21.1 | length 12.4
  Top w0.254: IC13.6@38.55,6.853 40.1,6.853 ; IC13.7@38.55,8.123 39.951,8.123 40.1,7.974 40.1,6.853 ; TP21.1@42.5,4.4 42.475,4.425 C46.2@42.475,6.8 ; IC11.3@45.8,6.827 42.502,6.827 C46.2@42.475,6.8 ; 40.1,6.853 42.422,6.853 C46.2@42.475,6.8
SPI_CLK: J5.24 R37.1 TP16.1 | length 14.2
  Top w0.254: R37.1@60.85,13.915 61.173,14.238 61.173,14.814 61.479,15.12 61.479,16.626 61.379,16.726 61.379,19.211 TP16.1@62.268,20.1 64.577,22.409 67.241,22.409 J5.24@68.27,21.38
SPI_CS: J5.23 R38.2 TP18.1 | length 11.9
  Top w0.254: R38.2@60.9,12.275 62.176,12.275 62.325,12.424 62.325,17.409 TP18.1@62.268,17.466 64.913,20.111 64.913,20.563 J5.23@65.73,21.38
SPI_MOSI: J5.20 R36.1 TP17.1 | length 16.9
  Top w0.254: R36.1@60.775,15.725 60.775,22.901 60.924,23.05 TP17.1@62.225,23.05 62.225,24.319 63.2,25.294 66.894,25.294 68.06,26.46 J5.20@68.27,26.46
transformer_Iret: J4.1 R6.I1 R34.2 | length 12.8
  Top w0.508: J4.1@10.69,40.955 17.695,40.955 17.85,40.8 ; R6.I1@17.85,39.04 R6.I1@18.1,38.79 18.1,40.55 17.85,40.8 ; R34.2@17.85,43.9 17.85,40.8
transformer_Isource: J4.6 R6.I2 R33.2 | length 17.5
  Top w0.508: R6.I2@15.075,39.195 R6.I2@14.67,38.79 14.549,38.669 10.881,38.669 8.359,41.191 8.359,42.116 J4.6@8.15,42.325 14.777,42.325 15.075,42.623 R33.2@15.075,43.826
v_DAC: C33.2 IC10.3 R35.2 TP12.1 | length 9.4
  Top w0.254: IC10.3@43.134,18.772 44.29,18.772 44.558,18.505 44.558,15.413 R35.2@44.243,15.098 45.962,15.098 C33.2@45.964,15.1 48.598,15.1 TP12.1@48.6,15.098
V_DIFF: IC2.6 IC3.3 RN1.5 TP2.1 | length 31
  Top w0.254: RN1.5@30.2,13.425 31.471,13.425 32.205,14.159 32.205,20.952 ; IC3.3@33.629,20.992 32.245,20.992 32.205,20.952 ; TP2.1@36.276,33.625 36.276,29.171 37.1,28.347 ; IC2.6@39.784,28.947 37.7,28.947 37.1,28.347 ; 32.205,20.952 32.205,24.135 32.571,24.501 36.853,24.501 37.1,24.748 37.1,28.347
pads on no net: D1.2 D2.2 FTG1.FTG2 FTG2.FTG2 FTG3.FTG2 FTG4.FTG2 FTG5.FTG2 FTG6.FTG2 IC1.1 IC1.5 IC1.8 IC2.1 IC2.5 IC2.8 IC3.1 IC3.5 IC3.8 IC4.1 IC4.5 IC4.8 IC5.1 IC5.5 IC5.8 IC6.1 IC6.5 IC6.8 IC7.1 IC7.5 IC7.8 IC8.1 IC8.5 IC8.8 IC9.1 IC9.5 IC9.8 IC10.1 IC10.5 IC10.8 IC14.8 IC14.9 J1.1 J1.4 J1.7 J1.10 J1.13 J1.16 J1.22 J2.14 J2.15 J2.16 J4.2 J4.3 J4.7 J4.8 J5.2 J5.3 J5.5 J5.6 J5.8 J5.9 J5.11 J5.12 J5.14 J5.15 J5.17 J5.18 J5.21 J5.26 J5.27 J5.28 J5.29 J5.34
copper on no net: | length 0.2
  Top w0.254: 39.779,31.522 39.935,31.366

## Polygon pours and split planes (outlines as drawn)
COIL_COMMON on Top "Top-COIL_COMMON" (solid, remove dead copper, pour order 20): 8.886,100 8.886,0 63.55,0 63.55,57.464 111.25,57.464 111.25,100
COIL_LOW on Top "Top-COIL_LOW" (solid, pour order 156): 12.27,71.89 13.24,71.89 13.24,69.82 13.25,69.81 13.24,69.8 12.25,69.8
GND1 on Top "GND1_L01_P004" (solid, remove dead copper, pour order 4): 64.3,0 64.3,56.65 111.25,56.65 111.25,0
no net on Top "Top-No Net" (solid, remove dead copper, pour order 18): -10.775,91.175
no net on Top "Top-No Net 2" (solid, remove dead copper, pour order 14): -9.875,91.275
no net on Top "Top-No Net 1" (solid, remove dead copper, pour order 2): -20.275,91.175
COIL_COMMON on L2 "L2-COIL_COMMON" (solid, remove dead copper, pour order 26): 63.5,57.45 111.243,57.45 111.25,100 8.875,100 8.875,0 63.5,0
GND1 on L2 "L2-COIL_COMMON 1" (solid, remove dead copper, pour order 6): 64.3,56.65 111.25,56.65 111.25,0 64.3,0
no net on L2 "L2-No Net" (solid, remove dead copper, pour order 22): -10.275,91.175
COIL_COMMON on L2 "L2-COIL_COMMON 2" (solid, remove dead copper, pour order 10): 103.425,8.975
COIL_COMMON on L2 "L2-COIL_COMMON 3" (solid, remove dead copper, pour order 8): 60.825,-10.925
P12V0A on L3 "P12V0A" (solid, remove dead copper, pour order 146): 8.7,17.1 20.6,17.1 82.325,17.1 82.325,91.975 8.7,91.975
N12V0A on L3 "N12V0A" (solid, remove dead copper, pour order 144): 20.61,17.075 44.825,17.075 44.825,21.225 25.009,21.225 25.009,25.259 45.925,25.259 45.925,31.175 45.85,31.25 24.025,31.25 24.025,37.725 24.05,37.725 24.175,37.725 39.45,37.725 39.45,65.662 74.45,65.687 74.45,72.5 38.725,72.5 38.725,79.6 38.725,79.825 36.575,79.825 36.575,73.7 26.525,73.7 26.525,79.925 20.599,79.925 20.574,79.95 20.565,79.941 20.565,73.7 20.565,17.819
N12V0AS on L3 "N12V0AS" (solid, remove dead copper, pour order 140): 64,92.952 79.1,92.952 79.1,80.075 64,80.075
P15V0 on L3 "P15V0" (solid, remove dead copper, pour order 76): 60.225,-0.2 83.15,0 83.15,28.075 83.15,56.625 64.32,56.625 64.32,27.8 60.225,27.8 60.225,17.275 20.575,17.275 20.575,60.76 -2.325,60.76 -2.325,0 -0.05,-0.025 60.225,-0.025
N15V0 on L3 "N15V0" (solid, remove dead copper, pour order 66): 7.229,-0.025 111.4,-0.025 111.2,0.175 111.2,56.62 97.8,56.62 97.8,17.75 64.425,17.75 64.425,12.725 15,12.725 15,54.625 7.229,54.625
GND1 on L3 "L3-GND1 1" (solid, remove dead copper, pour order 54): 64.225,-0.05 70.825,-0.05 70.85,-0.025 70.85,6.175 64.3,6.175 64.275,6.15 64.275,3.575 10.75,3.575 10.75,9.7 7.175,9.7 7.175,38.125 11.488,38.125 12.05,38.687 12.05,50.6 9.925,50.6 9.525,50.663 9.4,50.538 9.4,49.175 7.175,49.175 7.175,50.275 3.95,50.275 3.95,49.125 -2.3,49.125 -2.3,10.499 0,8.199 0,0 64.226,0
P12V0AS on L3 "P12V0AS" (solid, remove dead copper, pour order 136): 67.275,92.952 67.275,86.964 74.7,86.966 74.7,80.275 79,80.275 79,92.95 78.975,92.975
COIL_HIGH on L3 "L3-COIL_HIGH" (solid, remove dead copper, pour order 120): 79.488,77.525 79.597,77.417 82.325,77.417 82.325,72.5 82.525,72.3 111.25,72.3 111.25,91.95 111.325,92.025 111.325,99.875 111.15,100.05 111.1,100 9.075,100 8.925,77.4 15.2,77.4 15.2,92.025 79.488,92.025
GND1 on L3 "L3-GND1" (solid, remove dead copper, pour order 148): 83.15,56.625 83.175,56.65 97.825,56.65 97.825,17.775 97.8,17.75 83.15,17.75
no net on L3 "L3-No Net 4" (solid, remove dead copper, pour order 126): 7.925,67.375
no net on L3 "L3-No Net 5" (solid, remove dead copper, pour order 122): 8.05,67.725
no net on L3 "L3-No Net 2" (solid, remove dead copper, pour order 118): 39.85,-18.725
no net on L3 "L3-No Net" (solid, remove dead copper, pour order 52): -16.325,44.054
no net on L3 "L3-No Net 1" (solid, remove dead copper, pour order 32): 49.225,-3.075
COIL_COMMON on Bottom Layer "bottom_gnd" (solid, remove dead copper, pour order 150): 9.087,100 111.25,100 111.25,57.475 63.55,57.475 63.5,57.425 63.5,0.004 8.766,0.004
GND1 on Bottom Layer "12V_JACK_GND" (solid, remove dead copper, pour order 92): 11.762,17.575 19,17.575 19.18,17.575 19.75,17.575 69.407,17.575 69.407,9.87 11.689,9.87
GND1 on Bottom Layer "Bottom-GND1" (solid, remove dead copper, pour order 134): 64.3,0 64.3,56.675 111.25,56.675 111.25,0
P12V0S on Bottom Layer "JACK_PWR_IN" (solid, remove dead copper, pour order 90): 19.805,0.002 69.57,0.027 69.57,12.406 64.62,12.406 64.62,9.949 19.805,9.951
P5V0 on Bottom Layer "P5V0" (solid, remove dead copper, pour order 78): 53.075,14.2 53.1,14.175 53.1,11.95 32.325,11.95 32.325,12.675 32.325,14.075
COIL_COMMON on Bottom Layer "Bottom-GND" (solid, remove dead copper, pour order 154): -12.575,-12.625
no net on Bottom Layer "Bottom Layer-No Net 2" (solid, remove dead copper, pour order 0): 58.1,14.7
no net on Bottom Layer "Bottom Layer-No Net" (solid, remove dead copper, pour order 132): 55.35,6.461

## Keep-outs
Top:
  region: 111.25,0 111.25,2.5 0,2.5 0,0
  region: 0,100 0,97.5 111.25,97.5 111.25,100
Bottom Layer:
  region: 0,97.5 0,100 111.25,100 111.25,97.5
  region: 0,0 0,2.5 111.25,2.5 111.25,0

## Other copper
Top:
  pour cut-out: 20.519,58.375 20.519,56.12 20.499,56.1 20.499,55.85 25.506,55.85 25.506,40.706 25.511,40.689 26.3,40.689 26.3,58.317
  pour cut-out: 11.127,70.727
  pour cut-out: -24.075,85.95
  pour cut-out: -0.35,86.175 -0.35,40.65 -0.15,40.45 17.075,40.45 17.075,85.175 16.3,85.95
  pour cut-out: 55.58,42.911 -2.3,42.912 -2.3,40.689 7.657,40.689 55.58,40.689
  pour cut-out: 9.6,40.8
  pour cut-out: 4.4,65.5
  pour cut-out: 8.5,46
  pour cut-out: 10.5,52 19.15,52 19.15,42.1 10.5,42.1
L2:
  pour cut-out: 20.525,58.402 22.875,58.398 22.875,56.125 20.5,56.125
  pour cut-out: -28.55,21.95
  pour cut-out: -2.3,40.7 55.575,40.7 55.575,42.925 -2.3,42.925
L3:
  pour cut-out: 64.32,27.8 64.32,56.625 63.575,56.625 63.55,56.65 63.54,56.64 63.54,27.78
  pour cut-out: 111.25,56.65 63.55,56.65 63.55,57.464 111.25,57.464
  pour cut-out: 20.565,73.7 20.55,73.685 20.55,67.625
Bottom Layer:
  pour cut-out: 14.12,-17.02
  pour cut-out: 6.32,16.96 11.86,16.96 11.86,2.57 6.32,2.57
  pour cut-out: 20.525,58.575 22.85,58.575 22.85,56.3 20.5,56.3
  pour cut-out: -2.3,42.925 -2.3,40.7 55.575,40.7 55.575,42.838

## Silkscreen, mask and mechanical layers (free items; w line width, h text height)
Top Overlay:
  lines w0.254: 13.825,41.7 19.65,41.7 19.65,48.8 13.825,48.8 13.825,41.7
  text "J1" at 65.75,93 h1.52
  text "COMMON" at 12.275,85.075 h0.75
  text "FB OFFSET" at 57.15,84.139 h0.75
  text "HIGH" at 12.125,80.2 h0.75
  text "P12V0A" at 55.925,77.3 h0.75
  text "GND" at 35.275,75.875 h0.75
  text "LOW" at 13.225,75.525 h0.75
  text "N12V0A" at 55.925,72.625 h0.75
  text "J2" at 26.275,60.1 h1.52
  text "N15V0" at 100.675,59.4 h0.75
  text "FB Iset" at 14.825,58.175 h0.75
  text "P15V0" at 75.4,55.9 h0.75
  text "GND" at 71.45,54.925 h0.75
  text "J5" at 65.625,51.6 h1.52
  text "Populate if not using transformer" at 12.75,49.675 h0.75
  text "Stabilizer / Current Sense AFE / Rev 1.0 / OITG 2019" at 31.075,46.8 h1.52
  text "P5V0" at 55.85,42.95 h0.75
  text "V_ERR" at 45.65,35.61 h0.75
  text "V_DIFF" at 34.384,35.175 h0.75
  text "MOSI" at 58.225,22.605 h0.75
  text "CLK" at 58.875,19.664 h0.75
  text "OFFSET" at 52.875,17.458 h0.75
  text "CS" at 59.6,17 h0.78
  text "V_DAC" at 49.975,14.7 h0.75
  text "GND" at 35.35,12.025 h0.75
  text "12V0AS" at 68.625,4.35 h0.75
  text "V_REF" at 44.082,3.6 h0.75
Mechanical 1:
  the board outline again, w0.1

## Text inside footprints (layer, text, board x,y; h text height)
J3: Top Overlay "3" at -1.9,74.405 h0.75 r270; Top Overlay "2" at -1.9,79.405 h0.75 r270; Top Overlay "1" at -1.9,84.405 h0.75 r270
J4: Top Overlay "6" at 8.695,39.585 h0.75 r90; Top Overlay "9" at 8.67,52.135 h0.75 r90; Top Overlay "1" at 11.195,38.76 h0.75 r90; Top Overlay "5" at 11.21,53.505 h0.75 r90; Mechanical 14 "9 D-Sub Female" at 5.92,39.71 h0.75 r90; Mechanical 14 "6" at 8.695,39.585 h0.75 r90; Mechanical 14 "9" at 8.67,52.135 h0.75 r90; Mechanical 14 "1" at 11.195,38.76 h0.75 r90; Mechanical 14 "5" at 11.21,53.505 h0.75 r90